# Altium PCB MOTHERBOARD.PcbDoc (part 2 of 2)
Units mm, origin at the board's own origin, x right, y up, seen from the top; angles counter-clockwise.
Board outline 100.2 x 110.2 mm, 2 copper layers (Top Layer, Bottom Layer); 252 components, 137 nets, 662 pads, 40 vias.
Unrouted connection lines stored in the file: 342.
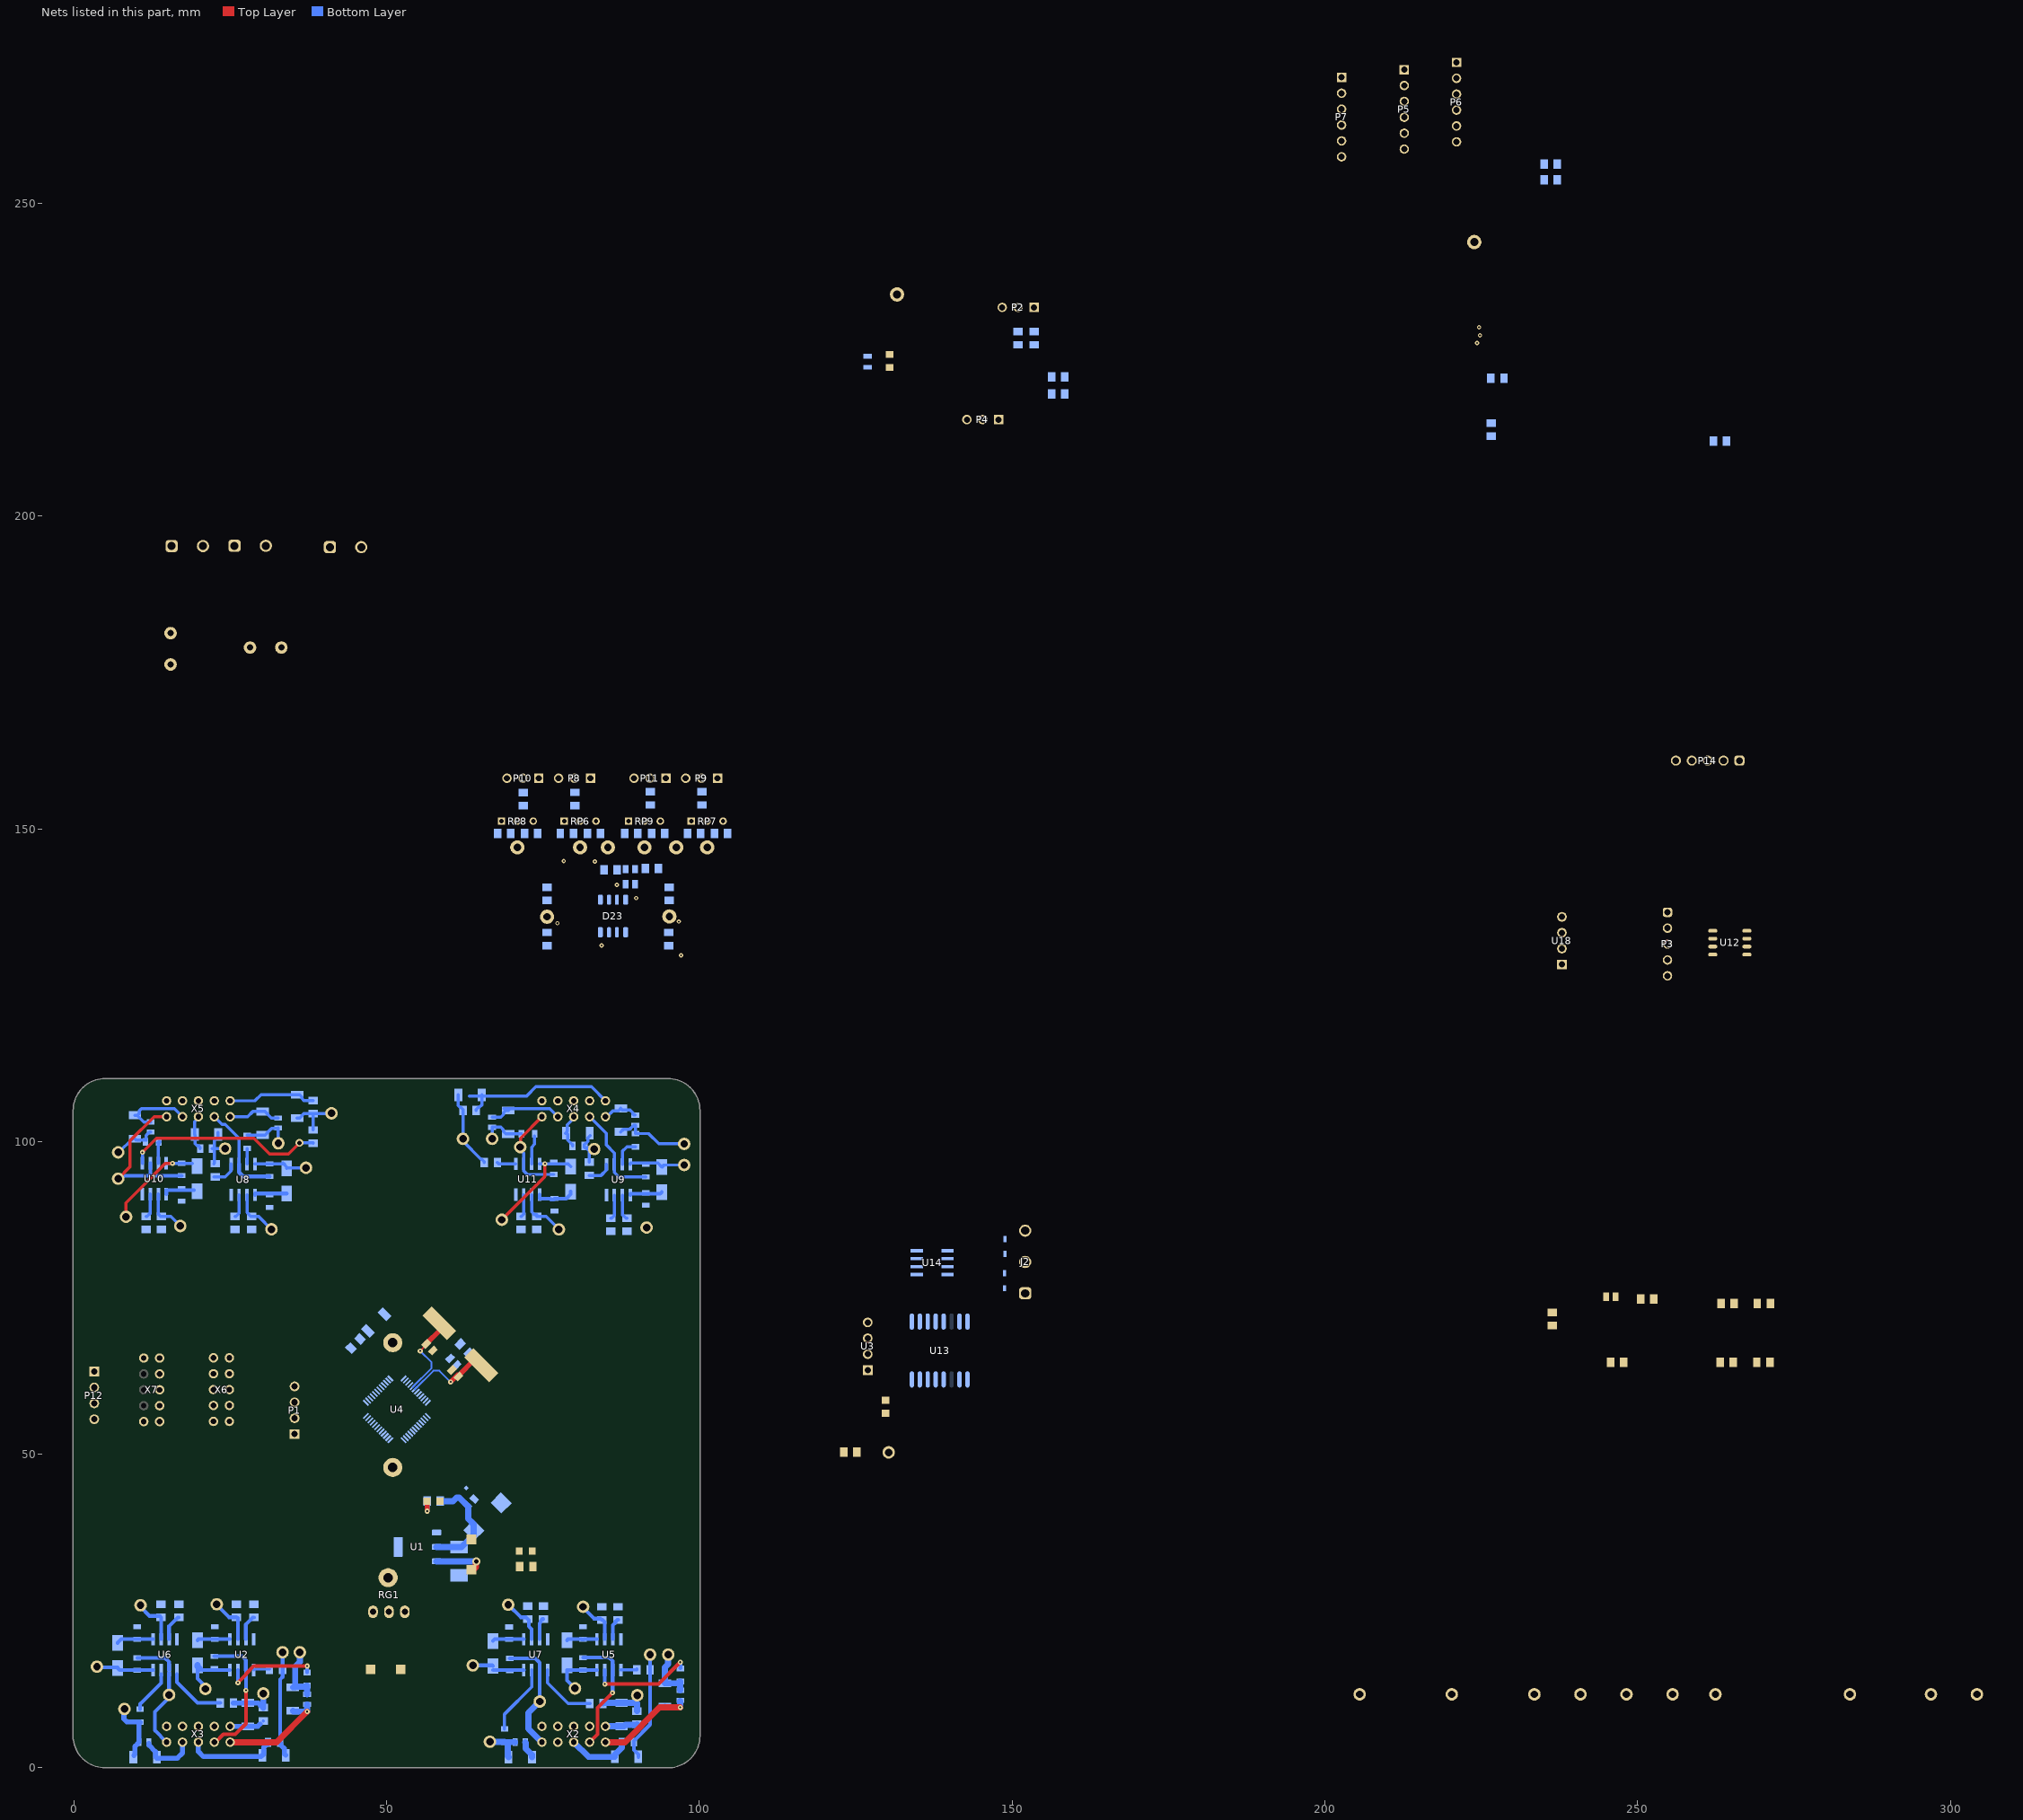
[diagram p2: the nets of this part, all layers, seen from the top]

## Part data
C1: library part CMP-04424-000193-1, "47uF 16V  ±20% 500mΩ 2312  SMD Tantalum Capacitor", Capacitance=47uF, Case Code (Imperial)=2312, Case Code (Metric)=6032, Case/Package=6032-28, ESR (Equivalent Series Resistance)=500mR, Leakage Current=7.5uA, Max Operating Temperature=125°C, Min Operating Temperature=-55°C, Package Quantity=1, Tolerance=20%, Voltage Rating=16V, Construction=Flat, Depth=3.2mm, Dissipation Factor=6%, Features="General Purpose", Height=2.8mm, Height - Seated (Max)=0.11inch, Lead Free="Lead Free", Length=6mm, Mount="Surface Mount", Number of Pins=2, Packaging="Tape and Reel", Polarity=Polar, Radiation Hardening=No, REACH SVHC="No SVHC", RoHS Compliant=Yes, Series=TAJ, Termination=SMD/SMT, Voltage Rating (DC)=16V, Width=3.2mm
C2 C45: library part 1000uF_10V_Size_F
C6: "Capacitor Polarised", Manufacturer_Name=Vishay, Mouser Part Number=74-293D106X9050E2TE3, Arrow Part Number=293D106X9050E2TE3, Arrow Price/Stock=https://www.arrow.com/en/products/293d106x9050e2te3/vishay, Datasheet Link=http://www.vishay.com/doc?40002, Height=4.3mm, Manufacturer_Part_Number=293D106X9050E2TE3, Mouser Price/Stock=https://www.mouser.com/Search/Refine.aspx?Keyword=74-293D106X9050E2TE3
C7 C9: library part CAP-POLAR
C8 C10 C17 C26 C27: library part CMP-1036-04552-2, "CAP CER 0.22UF 50V X7R 0805", Capacitance="0.22 μF", Manufacturer=KEMET, Package=C0805C-DN, Temperature="-55°C to +125°C", Temperature Characteristic=X7R, Temperature Coefficient=30ppm/°C, Temperature Range High=+125°C, Temperature Range Low=-55°C, Tolerance=0.1, Voltage Rating="50 V", Automotive=No, Category=Cap, ComponentLink2Description=Datasheet, ComponentLink2URL=https://content.kemet.com/datasheets/KEM_C1003_C0G_SMD.pdf, Device Class L1="Passive Components", Device Class L2=Capacitors, Device Class L3="Ceramic Capacitors", Digikey Description="CAP CER 0.22UF 50V X7R 0805", Height=0.88mm, Ipc Land Pattern Name=CAPC200125X78, Lead Free=Yes, Manufacturer Part Number=C0805C224K5RACTU, Material=Ceramic, Mouser Description="CAP CER 0.22UF 50V X7R 0805", Octopart=https://octopart.com/c0805c224k5ractu-kemet-144670, RoHS=TRUE
C42 C48: library part CMP-1036-04552-2, "CAP CER 16pF 50V X7R 0805", Capacitance="0.22 μF", Manufacturer=KEMET, Manufacturer Part Number=C0805C224K5RACTU, Package=C0805C-DN, Temperature="-55°C to +125°C", Temperature Characteristic=X7R, Temperature Coefficient=30ppm/°C, Temperature Range High=+125°C, Temperature Range Low=-55°C, Tolerance=0.1, Voltage Rating="50 V", Automotive=No, Category=Cap, ComponentLink2Description=Datasheet, ComponentLink2URL=https://content.kemet.com/datasheets/KEM_C1003_C0G_SMD.pdf, Device Class L1="Passive Components", Device Class L2=Capacitors, Device Class L3="Ceramic Capacitors", Digikey Description="CAP CER 0.22UF 50V X7R 0805", Height=0.88mm, Ipc Land Pattern Name=CAPC200125X78, Lead Free=Yes, Material=Ceramic, Mouser Description="CAP CER 0.22UF 50V X7R 0805", Octopart=https://octopart.com/c0805c224k5ractu-kemet-144670, RoHS=TRUE
D1 D2 D7 D8 D13 D14 D19 D20: library part CMP-12791-000009-1, "DIODE GEN PURP 400V 1A SMA", Capacitance=20pF, Forward Current=1A, Manufacturer="Diodes Inc.", Max Junction Temp=+150°C, Max Repetitive Reverse Voltage=400V, Max Surge Forward Current=30A, Package=SMA, Peak Reverse Current=5uA, Temperature="-65°C to +150°C", Temperature Range Low=-65°C, Automotive=No, Category=Diode, ComponentLink2Description=Datasheet, ComponentLink2URL=https://www.diodes.com/assets/Datasheets/ds16008.pdf, Device Class L1="Discrete Semiconductors", Device Class L2=Diodes, Device Class L3="Rectifier Diodes", Digikey Description="DIODE GEN PURP 400V 1A SMA", Footprint Url=https://www.diodes.com/assets/Package-Files/SMA.pdf, Height=2.4mm, Lead Free=Yes, Manufacturer Part Number=US1G-13-F, Mouser Description="Rectifiers 400V 1A", Octopart=https://octopart.com/us1g-13-f-diodes+inc.-334651, Reverse Voltage=400V, RoHS=TRUE, Standoff Height=0.05mm, Temperature Range High=+150°C
D3 D4 D5 D6 D9 D10 D11 D12 D15 D16 D17 D18 D21 D24 D25 D26 D27: library part CMP-249167-000001-1, "DIODE GEN PURP 75V 150MA SOD80", Capacitance=4pF, Forward Current=300mA, Manufacturer="Vishay Small Signal", Max Junction Temp=+175°C, Max Repetitive Reverse Voltage=100V, Max Surge Forward Current=2A, Package=6.560-5005.01-4, Peak Reverse Current=5uA, Reverse Voltage=75V, Temperature="to +175°C", Automotive=Yes, Automotive Grade="Grade 0", Category=Diode, ComponentLink2Description=Datasheet, ComponentLink2URL=http://www.vishay.com/docs/85557/ll4148.pdf, Device Class L1="Discrete Semiconductors", Device Class L2=Diodes, Device Class L3="Rectifier Diodes", Digikey Description="DIODE GEN PURP 75V 150MA SOD80", Height=1.6mm, Lead Free=Yes, Manufacturer Part Number=LL4448-GS08, Mouser Description="Diodes - General Purpose, Power, Switching 100 Volt 100mA", Octopart=https://octopart.com/ll4448-gs08-vishay+small+signal-40886, RoHS=TRUE, Temperature Range High=+175°C
D22 D28 D29 D30: "WURTH ELEKTRONIK - 151031YS06000 - LED, Yellow, Through Hole, T-1 (3mm), 30 mA, 2 V, 590 nm", Manufacturer_Name="Wurth Elektronik", Mouser Part Number=710-151031YS06000, Datasheet Link=https://katalog.we-online.de/led/datasheet/151031YS06000.pdf, Geometry.Height=5.5mm, Manufacturer_Part_Number=151031YS06000, Mouser Price/Stock=https://www.mouser.co.uk/ProductDetail/Wurth-Elektronik/151031YS06000?qs=LlUlMxKIyB3xSYYW%252BcuBiQ%3D%3D
D23: "Микросхема сдвоенный ОУ", Package=8-SOIC, ComponentDescription="Микросхема сдвоенный ОУ, LMV358AIDR, 8-SOIC", ComponentTypе="Микросхема сдвоенный ОУ"
D48: library part CMP-14400-000025-1, "DIODE ZENER 5.1V 300MW SOD323"
J1 J4 J15: "WR-TBL Series 101 Horizontal Entry Modular, THT, pitch 5mm, 2p", Manufacturer="Wurth Elektronik", Operating Temperature Max=105°C, Operating Temperature Min=-40°C, Rated Current=16A, Working Voltage=250V, Application="Pressure Clamp", Category="Terminal Blocks", ComponentLink1Description="Website Link", ComponentLink1URL=https://www.we-online.com/redexpert/article/691101710002?ad, ComponentLink2Description="Datasheet Link", ComponentLink2URL=https://www.we-online.com/redexpert/spec/691101710002?ad, Manufacturer Part Number=691101710002, Match Code=WR-TBL, Modularity=Yes, Mount="Through Hole", Number of Pins=2, Number of Rows=1, Orientation=Horizontal, Packaging=Box, Pitch=5mm
J2: "WR-TBL Series 101 Horizontal Entry Modular, THT, pitch 5mm, 3p", Manufacturer="Wurth Elektronik", Operating Temperature Max=105°C, Operating Temperature Min=-40°C, Rated Current=16A, Working Voltage=250V, Application="Pressure Clamp", Category="Terminal Blocks", ComponentLink1Description="Website Link", ComponentLink1URL=https://www.we-online.com/redexpert/article/691101710003?ad, ComponentLink2Description="Datasheet Link", ComponentLink2URL=https://www.we-online.com/redexpert/spec/691101710003?ad, Manufacturer Part Number=691101710003, Match Code=WR-TBL, Modularity=Yes, Mount="Through Hole", Number of Pins=3, Number of Rows=1, Orientation=Horizontal, Packaging=Box, Pitch=5mm
P1 P12: library part CMP-1024-00357-1, "0.025\" SQ Post Header, Through-hole, Vertical, -55 to 125 degC, 2.54 mm Pitch, 4-Pin, Male, RoHS", Manufacturer=Samtec, Temperature Range="-55 to 125 degC", ComponentLink1Description="Manufacturer URL", ComponentLink1URL=http://www.samtec.com, ComponentLink2Description=Datasheet, ComponentLink2URL=http://www.samtec.com/documents/webfiles/pdf/TSW_TH.PDF, ComponentLink3Description="Package Specification", ComponentLink3URL=http://www.samtec.com/documents/webfiles/cpdf/TSW-XXX-XX-XXX-X-XX-XXX-MKT.pdf, DatasheetVersion=F-214, Mounting Technology=Through-hole, Orientation=Vertical, PackageDescription=".025[0.64] SQ. Post Terminal Strip Assembly", PackageReference=TSW-104-08-X-S, PackageVersion="DM, 8/1988", PartNumber=TSW-104-08-G-S, Pitch="2.54 mm", RoHS=True
P2 P4 P8 P9 P10 P11: "WR-WTB THT Male Vertical Locking Header, pitch 2.54mm, 3p", Contact Resistance=20mOhm, Operating Temperature="-40 to +105degC", Rated Current=3A, Withstanding Voltage=1000VAC, Working Voltage=250VAC, ComponentLink1Description=Manufacturer, ComponentLink1URL=http://www.we-online.de, ComponentLink2Description=Datasheet, ComponentLink2URL=https://www.we-online.com/catalog/datasheet/61900311121.pdf, Gender=Male, Mounting Technology=THT, Packaging=Bag, Part Number=61900311121, Pin Number=3, Pitch=2.54mm, Published Date="January 2020", Publisher="Wurth Elektronik", Type=Vertical
P3: "WR-WTB THT Male Vertical Locking Header, pitch 2.54mm, 5pins", Contact Resistance=20mΩ, Manufacturer="Wurth Elektronik", Operating Temperature Max=105°C, Operating Temperature Min=-40°C, Rated Current=3A, Withstanding Voltage=1000VAC, Working Voltage=250VAC, Category="Wire-to-Board Connectors", ComponentLink1Description="Website Link", ComponentLink1URL=https://www.we-online.com/redexpert/article/61900511121?ad, ComponentLink2Description="Datasheet Link", ComponentLink2URL=https://www.we-online.com/redexpert/spec/61900511121?ad, Gender=Male, Height=11.5mm, Length=12.7mm, Manufacturer Part Number=61900511121, Match Code=WR-WTB, Mount="Through Hole", Number of Pins=5, Number of Rows=1, Orientation=Vertical, Packaging=Bag, Pitch=2.54mm, Width=5.8mm
P5 P6 P7: "WR-WTB THT Male Vertical Locking Header, pitch 2.54mm, 6p", Contact Resistance=20mOhm, Operating Temperature="-40 to +105degC", Rated Current=3A, Withstanding Voltage=1000VAC, Working Voltage=250VAC, ComponentLink1Description=Manufacturer, ComponentLink1URL=http://www.we-online.de, ComponentLink2Description=Datasheet, ComponentLink2URL=https://www.we-online.com/catalog/datasheet/61900611121.pdf, Gender=Male, Mounting Technology=THT, Packaging=Bag, Part Number=61900611121, Pin Number=6, Pitch=2.54mm, Published Date="January 2020", Publisher="Wurth Elektronik", Type=Vertical
P14: "WR-PHD Pin Header, THT, Vertical, pitch 2.54mm, 1 Row, 5P", Contact Resistance=20mΩ, Manufacturer="Wurth Elektronik", Operating Temperature Max=105°C, Operating Temperature Min=-40°C, Rated Current=3A, Withstanding Voltage=500V, Working Voltage=250V, Category="Board-to-Board Connectors", ComponentLink1Description="Website Link", ComponentLink1URL=https://www.we-online.com/redexpert/article/61300511121?ad, ComponentLink2Description="Datasheet Link", ComponentLink2URL=https://www.we-online.com/redexpert/spec/61300511121?ad, Gender="Pin Header", Manufacturer Part Number=61300511121, Match Code=WR-PHD, Mount="Through Hole", Number of Pins=5, Number of Rows=1, Orientation=Vertical, Packaging=Bag, Pitch=2.54mm
R1 R2 R10 R17 R18 R19 R21 R31 R32 R33 R34 R45 R46 R47 R48 R58 R59 R60 R61 R83 R84 R85 R86 R87 R88 R89 R93 R94 R97 R99 R100 R101 R102: library part CRCW08050000Z0EA
R3 R4 R5 R8 R9 R20 R22 R38 R39 R57 R62 R63 R64 R65 R66 R67 R68 R91 R92 R95 R96 R113: library part RC0805FR-07100KL
R6 R7 R11 R12 R23 R24 R25 R26 R35 R36 R37 R40 R49 R50 R51 R52: library part CMP-03412-028725-1, "RES SMD 10 OHM 1% 1/8W 0805", Manufacturer=Yageo, Package=RT0805, Power Rating=0.125W, Resistance=10Ω, Temperature="-55°C to +155°C", Temperature Coefficient="50 ppm/°C", Temperature Range High=+155°C, Temperature Range Low=-55°C, Tolerance=0.0001, Voltage Rating=150V, Automotive=No, Category=Res, ComponentLink2Description=Datasheet, ComponentLink2URL=http://www.yageo.com/documents/recent/PYu-RT_1-to-0.01_RoHS_L_9.pdf, Composition="Thin Film", Device Class L1="Passive Components", Device Class L2=Resistors, Device Class L3="Chip SMD Resistors", Digikey Description="RES SMD 10 OHM 1% 1/8W 0805", Footprint Url=http://www.yageo.com/exep/pages/download/literatures/PYu-R_Mount_10.pdf, Height=0.6mm, Ipc Land Pattern Name=RESC200125X50, Lead Free=Yes, Manufacturer Part Number=RT0805FRE0710RL, Mouser Description="High Precision-High Stability Chip Resistor Thin Film 0805 10Ohm 1% Paper T/R", Octopart=https://octopart.com/rt0805fre0710rl-yageo-39855890, RoHS=TRUE, Series=RT
R13 R14 R15 R16 R27 R28 R29 R30 R41 R42 R43 R44 R53 R54 R55 R56 R98: library part CMP-2001-04908-2, "RES Thick Film, 10kΩ, 1%, 0.125W, 100ppm/°C, 0805", Case Code (Imperial)=0805, Case Code (Metric)=2012, Max Operating Temperature=155°C, Min Operating Temperature=-55°C, Package Quantity=5000, Power Rating=125mW, Resistance=10kR, Temperature Coefficient=100ppm/°C, Tolerance=1%, Voltage Rating=150V, Case/Package=0805, Composition="Thick Film", Contact Plating=Tin, Depth=1.25mm, Height=0.45mm, Lead Free="Lead Free", Length=2mm, Military Standard=Not, Packaging="Tape and Reel", Radiation Hardening=No, Termination=SMD/SMT, Voltage Rating (DC)=150V, Weight=0.000194oz, Width=1.25mm
RG1: "REG IC REG LINEAR 5V 1A TO220AB", Current-Output=1A, Digikey Part Number=LM7805CT-ND, Manufacturer=Fairchild, Mouser Part Number=512-LM7805CT, Package=TO220, Part Number=LM7805CT, Temperature="-40°C to +125°C", Temperature Range High=+125°C, Temperature Range Low=-40°C, Voltage - Input (Max)=35V, Voltage - Output=5V, Voltage Dropout (Max)="2V @ 1A (Typ)", ComponentLink1Description=Upverter, ComponentLink1URL=https://upverter.com/upn/revision/b27a7358b7dd93a3/, ComponentLink2Description=Datasheet, ComponentLink2URL=https://www.fairchildsemi.com/datasheets/LM/LM7805.pdf, Digikey Description="REG IC REG LINEAR 5V 1A TO220AB", helpURL=https://upverter.com/upn/revision/b27a7358b7dd93a3/, Ipc Land Pattern Name=TO-220, Lead Free=yes, Price=0.384521982769, RoHS=TRUE, Supplier 1=Digi-Key, Supplier 2=Mouser, Supplier Part Number 1=LM7805CT-ND, Supplier Part Number 2=512-LM7805CT
RP6 RP7 RP8 RP9: library part 3296W-1-202LF
TP1 TP2 TP3 TP4 TP5 TP6 TP7 TP8 TP9 TP10 TP11 TP12 TP13 TP14 TP15 TP16 TP17 TP18 TP19 TP20 TP21 TP22 TP23 TP24 TP25 TP26 TP27 TP28 TP29 TP30 TP31 TP32 TP33 TP34 TP35 TP36 TP37 TP38 TP39 TP40 TP41 TP42 TP43 TP44 TP45 TP46 TP47 TP48 TP49 TP50 TP51 TP52 TP53 TP54 TP55 TP56 TP57: library part TP_PCB?, "Test_Point"
U1: library part CMP-0062-01639-4, "800mA Low-Dropout Linear Regulator, 4-pin SOT-223, Pb-Free", Manufacturer="Texas Instruments", PackageTopMarking=XYTT*N05A, PowerWise=N, Code_IPC=SOT223-4, Code_JEDEC=TO-261-AA, ComponentLink1Description="Datasheet URL", ComponentLink1URL=http://www.ti.com/general/docs/lit/getliterature.tsp?genericPartNumber=LM1117-N&fileType=pdf, CompType="LDO IC", High-Reliability=Y, PackageDescription="Molded SOT-223, 6.50 x 3.56 x 1.6mm Body, 4 Lead, 2.3mm Pitch", PackageReference=DCY0004A, PartNumber=LM1117MPX-3.3/NOPB, PinCount=4, RoHS=Y
U2 U5 U6 U7 U8 U9 U10 U11: "No Description Available", Mfr_Name=Infineon, Copyright="Copyright (C) 2023 Ultra Librarian. All rights reserved.", Manufacturer_Part_Number=IR2104SPBF, RefDes=RefDes, Type=DEV
U3 U18: library part B0505s-1W, "DC DC Converter 5V 1W"
U4: "No Description Available", Mfr_Name=STMicroelectronics, RefDes=RefDes, Type=Type
U12: library part CMP-0534-00654-1, "Hot Swappable, Dual I2C Isolator, 3 to 5.5 V, -40 to 105 degC, 8-Pin SOIC (R-8), RoHS, Tube", Generic Part Number=ADUM1250, Supply Voltage Max="5.5 V", Supply Voltage Min="3 V", Temperature Max="105 degC", Temperature Min="-40 degC", Code_JEDEC=MS-012-AA, ComponentLink1Description="Manufacturer URL", ComponentLink1URL=http://www.analog.com/, ComponentLink2Description=Datasheet, ComponentLink2URL=http://www.analog.com/media/en/technical-documentation/data-sheets/ADUM1250_1251.pdf, Data Rate="1 Mbps", DatasheetVersion="Rev. H", Mounting Technology="Surface Mount", PackageDescription="8-Pin Small Outline Package, Body 4.9 x 3.9 mm, Pitch 1.27 mm", Packing=Tube, PartNumber=ADuM1250ARZ, RoHS=TRUE
U13: library part CMP-0534-00565-1, "Quad Channel Digital Isolator, 2.5 KV rms Insulation Rating, 10 Mbps Data Rate, 50 ns Delay, Industrial, 16-pin SOIC (RW-16), Tube", Manufacturer="Analog Devices", Max Operating Temp (degreesC)=125, Code_JEDEC=MS-013-AA, ComponentLink1Description="Manufacturer URL", ComponentLink1URL=http://www.analog.com/en/index.html, ComponentLink2Description=Datasheet, ComponentLink2URL=http://www.analog.com/static/imported-files/data_sheets/ADuM1400_1401_1402.pdf, ComponentLink3Description="Package Specification", ComponentLink3URL=http://www.analog.com/static/imported-files/packages/PKG_PDF/SOIC_WIDE%20%28RW%29/RW_16.pdf, ComponentLink4Description="URL Link1", ComponentLink4URL="Product URL:http://www.analog.com/en/interface-isolation/digital-isolators/adum1401/products/product.html", ComponentLink5Description="URL Link2", ComponentLink5URL="Reference Circuit:http://www.analog.com/en/interface-isolation/digital-isolators/adum1401/products/product.html#product-recommendations", DatasheetVersion="Rev. H", Max Data Rate=10Mbps, Mounting Technology="Surface Mount", PackageDescription="16-Pin Standard Small Outline Package, Body 10.3 x 7.5 mm, Pitch 1.27 mm", PackageReference=RW-16, PackageVersion="032707-B, 03/2007", PartNumber=ADUM1401BRWZ
U14: library part CMP-05679-000003-1, "IC TXRX RS485/RS422 8-SOIC", Manufacturer="Maxim Integrated", Max Supply Voltage=5.25V, Min Supply Voltage=4.75V, Nominal Supply Current=300-500uA, Package=S8-5, Temperature="0°C to +70°C", Temperature Range High=+70°C, Temperature Range Low=0°C, Automotive=No, Category=IC, ComponentLink2Description=Datasheet, ComponentLink2URL=https://datasheets.maximintegrated.com/en/ds/MAX1487E-MAX491E.pdf, Data Rate=2.5Mbits/s, Device Class L1="Integrated Circuits (ICs)", Device Class L2="Interface ICs", Device Class L3="RS-232 / RS-422 / RS-485 Interface ICs", Digikey Description="IC TXRX RS485/RS422 8-SOIC", Footprint Url=https://pdfserv.maximintegrated.com/land_patterns/90-0096.PDF, Height=1.75mm, Interface=RS-485,RS-422, Lead Free=Yes, Manufacturer Part Number=MAX485ECSA+, Mouser Description="MAX485E Series 2.5 Mbps 12 V Half-Duplex SMT RS 485 Transceiver - SOIC-8", Number Of Receivers=1, Number Of Transmitters=1, Octopart=https://octopart.com/max485ecsa%2B-maxim+integrated-39397871, RoHS=TRUE, Simplex Duplex="Half Duplex", Standoff Height=0.1mm
X1: library part CMP-2000-05726-1, "Low Profile Crystal, 16.0 MHz, +/- 30 ppm, -20 to 70 degC, 2-Pin SMD, RoHS, Tape and Reel", Case Height=4.2mm, Case Length=11.4mm, Case Width=4.7mm, Frequency=8MHz, Frequency Stability=50PPM, Load Capacitance=18pF, Manufacturer=ABRACON, Operating Temperature Range=-20Cto+70C, Package / Case=HC-49/US, Package Description="2-Pin Surface Mount Device, Body 11.4 x 4.7 mm", Package Reference=ABLS-14.7456MHZ-B2-T, Tolerance=30PPM, Brand=ABRACON, Datasheet URL=http://www.abracon.com/Resonators/abls.pdf, Datasheet Version=04/2011, Dimensions=4.7mmWx11.4mmLx4.2mmH, ESR=80Ohms, Factory Pack Quantity=1000, Manufacturer URL=http://www.abracon.com/, Mounting Style=SMD/SMT, Mounting Technology=SurfaceMount, Package URL=http://www.abracon.com/Support/PackageDrawing/Resonators/ABLS-2D.pdf, Packaging=Reel, Product Category=Crystals, RoHS=Details, Series=ABLS, Termination Style=SMD/SMT, Type=LowProfileMicroprocessorCrystal
Z1 Z2: "Zener Diode", Manufacturer_Name=onsemi, Mouser Part Number=863-MM3Z5V1ST1G, Arrow Part Number=MM3Z5V1ST1G, Arrow Price/Stock=https://www.arrow.com/en/products/mm3z5v1st1g/on-semiconductor?region=nac, Datasheet Link=http://www.onsemi.com/pub/Collateral/MM3Z2V4ST1-D.PDF, Height=1.1mm, Manufacturer_Part_Number=MM3Z5V1ST1G, Mouser Price/Stock=https://www.mouser.co.uk/ProductDetail/onsemi/MM3Z5V1ST1G?qs=HVbQlW5zcXXFXX%2FQxsNWFg%3D%3D

## Via types
v1: diameter 0.8, hole 0.3, Top Layer to Bottom Layer, 22 vias
v2: diameter 0.7/0.7 (per signal layer), hole 0.3, Top Layer to Bottom Layer, tented both sides, 12 vias
v3: diameter 5, hole 3, Top Layer to Bottom Layer, 4 vias
v4: diameter 1.27, hole 0.711, Top Layer to Bottom Layer, 2 vias

## Nets (pads, with @x,y where several pads share a name; then routed paths per layer and width w, separated by ;. In a path a pad name is that pad's centre, name@x,y a point inside that pad or via, vN(x,y) a via of type N, cw(c..) or ccw(c..) an arc to the next point about the centre after c; other vN are vias at no path point)
+3V3: C1.2 C6.1 C8.1 C10.1 C45.1 D27.2 D48.1 P1.1 P5.1 P6.1 P7.1 P14.4 R1.2 R3.2 R4.2 R10.2 R57.2 R89.2 TP48.1 U1.2 U1.4 U4.9 U4.24 U4.36 U4.48 U12.1 X2.9 X3.9 X4.9 X5.9 X6.2 X7.2 | length 16.7
  Bottom Layer w1: U1.2@58,35.225 C1.2@61.306,35.225 ; R57.2@58.602,42.525 60.605,42.525 D48.1@61.175,43.095 61.635,43.095 62.911,41.818 C8.1@62.947,41.818 63.053,41.712 63.053,39.725 63.952,38.825 63.952,37.127 62,35.175 C1.2@61.6,35.175
  other v2: 224.657,230.179
+5V: C2.1 C26.1 C27.1 D23.8 J4.1 P2.3 P4.3 P5.2 P6.2 P8.3 P9.3 P10.3 P11.3 P12.4 P14.5 R68.2 R87.2 R88.2 R99.2 R100.2 RG1.3 RP6.1 RP7.1 RP8.1 RP9.1 TP13.1 TP14.1 U1.3 U3.2 U13.1 U13.7 U18.2 X6.1 X7.1 | length 8.2
  Top Layer w1: C2.1@63.571,31.587 63.892,31.587 64.281,31.977 64.281,32.873 v4(64.333,32.925)
  Bottom Layer w1: U1.3@58,32.925 v4(64.333,32.925)
+5V_ISO: C17.1 R5.2 R8.2 R9.2 TP47.1 U3.4 U13.10 U13.16 U14.8
GND: BT1.1 C1.1 C2.2 C3.1 C4.1 C6.2 C7.2 C8.2 C9.2 C10.2 C14.1 C15.1 C16.1 C20.1 C25.1 C26.2 C27.2 C29.1 C42.2 C45.2 C48.2 D22.2 D23.4 D28.2 D29.2 D30.2 D48.2 J1.1 J4.2 J15.1 P1.4 P2.1 P4.1 P5.6 P6.6 P7.6 P8.1 P9.1 P10.1 P11.1 P12.3 P14.1 R2.2 R13.1 R14.1 R15.1 R16.1 R22.2 R27.1 R28.1 R29.1 R30.1 R39.2 R41.1 R42.1 R43.1 R44.1 R53.1 R54.1 R55.1 R56.1 R67.1 R93.1 R94.1 R95.1 R96.1 R101.2 R102.2 RG1.2 RP6.3 RP7.3 RP8.3 RP9.3 U1.1 U2.4 U3.1 U4.8 U4.23 U4.35 U4.47 U5.4 U6.4 U7.4 U8.4 U9.4 U10.4 U11.4 U12.4 U13.2 U13.8 U18.1 X2.8 X2.10 X3.8 X3.10 X4.8 X4.10 X5.8 X5.10 X6.3 X7.3
  other v2: 77.308,134.931 96.735,135.206 89.927,138.942 224.807,228.904
GND_2: C17.2 J2.2 R65.1 R66.1 TP57.1 U3.3 U13.9 U13.15 U14.5 Z1.2 Z2.2
NetBT1_2: BT1.2 D27.1 U4.1
NetC5_1: C5.1 U2.6 X3.2 | length 21.7
  Top Layer w0.6: X3.2@22.46,4 22.649,4 23.915,5.265 25.83,5.265 27.526,6.961 v1(27.526,12.275)
  Bottom Layer w0.6: C5.1@22.475,17.75 26.868,17.75 27.51,17.108 U2.6@27.51,15.536 27.518,15.528 27.518,12.283 v1(27.526,12.275)
NetC5_2: C5.2 D1.1 TP1.1 U2.8 | length 10
  Bottom Layer w0.6: D1.1@19.775,15.751 19.775,14.174 21.045,12.904 TP1.1@21.045,12.525 ; D1.1@19.775,16.305 20.543,15.536 22.55,15.536 U2.8@24.97,15.536
  Bottom Layer w0.98: D1.1@19.775,16.305 19.775,16.111 D1.1@20.135,15.751
NetC11_1: C11.1 U5.6 X2.2 | length 19.5
  Top Layer w0.6: X2.2@82.46,4 83.725,5.265 83.725,9.5 v1(86.125,11.9)
  Bottom Layer w0.6: C11.1@81.421,17.536 85.566,17.536 86.15,16.952 86.15,15.557 U5.6@86.171,15.536 86.15,15.515 86.15,11.925 v1(86.125,11.9)
NetC11_2: C11.2 D2.1 TP2.1 U5.8 | length 8.2
  Bottom Layer w0.6: TP2.1@80.122,12.6 78.852,13.87 78.852,15.536 U5.8@83.631,15.536
NetC12_1: C12.1 TP25.1 U6.6 X3.5 | length 19.4
  Bottom Layer w0.6: C12.1@10.15,17.475 14.575,17.475 15.235,16.815 U6.6@15.235,15.536 ; X3.5@14.84,4 12.95,5.89 12.95,8.85 15.235,11.135 TP25.1@15.235,11.562 U6.6@15.235,15.025
NetC12_2: C12.2 D7.1 TP9.1 U6.8 | length 9.2
  Bottom Layer w0.6: TP9.1@3.643,15.95 D7.1@7.025,15.95 ; D7.1@7.025,15.85 7.339,15.536 U6.8@12.695,15.536
NetC13_1: C13.1 TP26.1 U7.6 X2.5 | length 19.4
  Bottom Layer w0.6: C13.1@69.7,17.4 73.795,17.4 74.474,16.721 U7.6@74.474,15.536 ; TP26.1@74.487,10.513 U7.6@74.487,15.523
  Bottom Layer w0.98: TP26.1@74.487,10.513 TP26.1@74.5,10.5 72.681,8.681 72.681,6.159 X2.5@74.84,4
NetC13_2: C13.2 D8.1 TP10.1 U7.8 | length 8.1
  Bottom Layer w0.6: TP10.1@63.8,16.275 66.9,16.275 D8.1@67,16.175 ; D8.1@67.041,15.536 U7.8@71.934,15.536
NetC21_1: C21.1 U8.6 X5.2 | length 16
  Bottom Layer w0.5: X5.2@22.46,104 23.71,102.75 24.2,102.75 26.425,100.525 U8.6@26.425,96.451
  Bottom Layer w0.6: U8.6@26.425,96.425 26.425,95.094 27.079,94.44 C21.1@31.3,94.44
NetC21_2: C21.2 D13.1 TP29.1 U8.8 | length 9
  Bottom Layer w0.5: U8.8@28.965,96.425 D13.1@33.575,96.425 ; D13.1@33.425,96.575 D13.1@33.575,96.425 ; D13.1@33.7,96.425 D13.1@33.575,96.425 ; TP29.1@37.125,95.825 34.125,95.825 D13.1@34.025,95.725 34.025,95.975 D13.1@33.575,96.425
NetC22_1: C22.1 U9.6 X4.2 | length 15.9
  Bottom Layer w0.5: X4.2@82.46,104 83.71,102.75 83.721,102.75 83.981,102.491 83.981,102.479 85.116,101.344 85.116,99.501 86.415,98.202 U9.6@86.415,96.389 86.424,96.379 86.424,95.073 87.094,94.404 C22.1@91.456,94.404
NetC22_2: C22.2 D14.1 TP30.1 U9.8 | length 9.2
  Bottom Layer w0.5: U9.8@88.955,96.389 88.955,96.546 88.984,96.575 93.4,96.575 94,95.975 D14.1@94,95.925 94.351,96.276 TP30.1@97.587,96.276
NetC23_1: C23.1 TP43.1 U10.6 X5.5 | length 26.6
  Top Layer w0.5: TP43.1@7.095,94.086 8.95,95.941 8.95,100.102 12.848,104 X5.5@14.84,104
  Bottom Layer w0.6: TP43.1@7.095,94.086 7.501,94.086 7.98,94.565 12.245,94.565 ; U10.6@12.245,96.55 12.245,94.565 ; C23.1@17.243,94.565 12.245,94.565
NetC23_2: C23.2 D19.1 TP37.1 U10.8 | length 16.4
  Top Layer w0.5: TP37.1@8.355,88 8.355,90.237 14.623,96.505 15.728,96.505 v1(15.773,96.55)
  Bottom Layer w0.5: U10.8@14.785,96.55 v1(15.773,96.55) 17.243,96.55 D19.1@18.946,96.55
NetC24_1: C24.1 TP44.1 U11.6 X4.5 | length 15.4
  Top Layer w0.5: TP44.1@71.375,99.138 71.414,99.177 71.414,100.574 X4.5@74.84,104
  Bottom Layer w0.5: TP44.1@71.375,99.138 71.375,98.732 71.908,98.199 71.908,96.485 71.959,96.435 71.959,95.294 72.482,94.771 C24.1@76.738,94.771
NetC24_2: C24.2 D20.1 TP38.1 U11.8 | length 17
  Top Layer w0.5: TP38.1@68.429,87.525 75.321,94.417 v1(75.321,96.485)
  Bottom Layer w0.5: U11.8@74.47,96.464 74.492,96.485 78.985,96.485 D20.1@79.45,96.021
NetC42_1: C42.1 U4.5 X1.1 | length 14.3
  Top Layer w0.3: v1(55.379,66.535) 56.078,67.234 56.078,67.914 C42.1@56.22,68.055 ; X1.1@57.932,71.298 58.515,70.716 X1.1@58.515,69.86
  Top Layer w0.8: C42.1@56.42,67.765 X1.1@58.515,69.86
  Bottom Layer w0.3: U4.5@54.141,60.743 57.2,63.802 57.2,64.714 v1(55.379,66.535)
NetC48_1: C48.1 U4.6 X1.2 | length 13.8
  Top Layer w0.3: X1.2@63.635,64.739 64.908,64.739 X1.2@65.262,64.386
  Top Layer w0.8: v1(60.241,61.593) 61.355,62.706 C48.1@61.602,62.706 ; C48.1@61.885,62.989 X1.2@63.635,64.739
  Bottom Layer w0.3: U4.6@54.494,60.39 57.483,63.378 58.455,63.378 v1(60.241,61.593)
NetD3_1: D3.1 R6.1 R11.2 TP3.1 | length 10
  Bottom Layer w0.98: TP3.1@36.129,18.375 36.129,16.821 35.404,16.096 35.404,12.915 35.269,12.78 D3.1@35.029,12.78 35.404,12.78 35.482,12.858 37.037,12.858 37.194,13.015 37.264,13.015 R11.2@37.304,13.055 R6.1@37.304,11.657
NetD3_2: D3.2 R6.2 X3.1 | length 17.8
  Top Layer w0.98: X3.1@25,4 32.409,4 v1(37.304,8.895)
  Bottom Layer w0.98: D3.2@35.029,9.03 35.164,8.895 v1(37.304,8.895) R6.2@37.304,10.053
NetD4_1: D4.1 R7.1 R12.2 TP4.1 | length 8.8
  Bottom Layer w0.98: TP4.1@95.032,18 95.015,17.983 95.015,16.484 94.488,15.958 D4.1@94.488,13.425 96.618,13.425 96.853,13.66 96.923,13.66 R12.2@96.963,13.7 R7.1@96.963,12.302
NetD4_2: D4.2 D5.2 R7.2 R19.1 X2.1 X3.3 | length 32.4
  Top Layer w1: X2.1@85,4 88.088,4 93.638,9.55 v1(96.963,9.55)
  Bottom Layer w0.8: X3.3@19.92,4 19.92,2.505 20.725,1.7 29.925,1.7 D5.2@30.15,1.925 30.375,2.15 30.375,3.175 30.873,3.673 30.971,3.673 30.977,3.679 R19.1@30.977,3.977
  Bottom Layer w1: D4.2@94.488,9.675 94.613,9.55 v1(96.963,9.55) R7.2@96.963,10.602
NetD5_1: D5.1 R17.1 R19.2 TP7.1 | length 17
  Bottom Layer w0.6: R19.2@32.976,3.977 32.976,14.03 33.376,14.43 R17.1@33.376,15.675 TP7.1@33.376,18.375
  Bottom Layer w0.8: R19.2@32.878,3.977 33.079,3.777 33.079,3.576 33.675,2.98 33.675,2.15 D5.1@33.9,1.925
NetD6_1: D6.1 R18.1 R21.2 TP8.1 | length 17.7
  Bottom Layer w0.6: D6.1@90.25,1.65 90.25,2.025 90.115,2.16 90.113,2.16 89.539,2.734 89.539,3.888 89.526,3.901 89.526,4.201 92.132,6.807 R18.1@92.132,15.536 TP8.1@92.132,18
NetD6_2: D6.2 R21.1 X2.3 | length 10.4
  Bottom Layer w0.98: X2.3@79.92,4 82.27,1.65 D6.2@86.5,1.65 86.5,2.025 87.611,3.136 87.611,3.987 R21.1@87.624,4
NetD9_1: D9.1 R23.1 R25.2 TP11.1 | length 9.2
  Bottom Layer w0.8: TP11.1@8.1,9.316 8.014,9.23 8.014,7.719 8.482,7.25 10.55,7.25 R25.2@10.6,7.2 ; D9.1@9.602,1.9 9.752,2.05 9.752,3.3 R23.1@10.221,3.769 ; R23.1@10.398,4 10.398,6.681
NetD9_2: D9.2 R23.2 X3.4 | length 9
  Bottom Layer w0.8: R23.2@12.006,3.769 12.006,3.529 13.052,2.483 13.052,1.675 13.277,1.45 16.55,1.45 17.38,2.28 X3.4@17.38,4
NetD10_1: D10.1 R24.1 R26.2 TP12.1 | length 6.1
  Bottom Layer w0.98: TP12.1@66.525,4.075 66.55,4.05 68.85,4.05 R26.2@68.875,4.025 68.888,4.012 70.561,4.012 R24.1@70.573,4 ; R26.2@69.365,3.605 69.365,1.76 D10.1@69.5,1.625
NetD10_2: D10.2 R24.2 X2.4 | length 2.8
  Bottom Layer w0.98: R24.2@72.177,4 72.263,3.914 72.263,2.987 73.25,2 D10.2@73.25,1.625
NetD11_1: D11.1 R31.1 R33.2 TP27.1 | length 6.8
  Bottom Layer w0.8: R31.1@25.521,10.286 D11.1@27.825,10.286 29.503,10.286 29.796,9.993 R33.2@29.796,9.865
  Bottom Layer w1: R33.2@30.3,9.512 TP27.1@30.3,11.78
NetD11_2: D11.2 R33.1 X3.6 | length 5
  Bottom Layer w0.5: R33.1@30.3,7.41 R33.1@30.31,7.42
  Bottom Layer w0.8: X3.6@25.01,6.55 X3.6@25,6.54 25.002,6.538 27.823,6.538 D11.2@27.825,6.536 29.426,6.536 R33.1@29.796,6.906
NetD12_1: D12.1 R32.1 R34.2 TP28.1 | length 6.8
  Bottom Layer w0.98: R32.1@84.626,10.175 84.626,10.187 84.739,10.3 D12.1@87.575,10.3 89.99,10.3 90.055,10.235 90.055,9.002 R34.2@90.029,8.976
NetD12_2: D12.2 R34.1 X2.6 | length 5.2
  Bottom Layer w0.98: X2.6@85,6.54 85.005,6.545 87.57,6.545 D12.2@87.575,6.55 87.95,6.55 88.161,6.761 89.916,6.761 R34.1@90.029,6.874
NetD15_1: D15.1 R35.1 R37.2 TP31.1 | length 7.9
  Bottom Layer w0.5: R37.2@27.695,101.025 27.72,101.05 30.175,101.05 D15.1@30.2,101.075 30.575,101.075 30.95,101.45 31.634,102.134 32.603,102.134 R35.1@32.667,102.198 32.683,102.181 32.683,99.767 TP31.1@32.7,99.75
NetD15_2: D15.2 R35.2 X5.1 | length 8.4
  Bottom Layer w0.5: X5.1@25,104 27.789,104 28.614,104.825 30.575,104.825 31.598,103.802 R35.2@32.667,103.802
NetD16_1: D16.1 R36.1 R40.2 TP32.1 | length 12.8
  Bottom Layer w0.5: D16.1@87.45,101.575 87.825,101.95 88.824,101.95 89.368,102.494 89.522,102.648 R36.1@89.749,102.648 89.777,102.62 89.777,101.328 R40.2@89.806,101.3 91.9,101.3 93.525,99.675 TP32.1@97.85,99.675
NetD16_2: D16.2 R36.2 X4.1 | length 5.9
  Bottom Layer w0.5: X4.1@85,104 85.221,104 86.171,104.95 87.075,104.95 D16.2@87.45,105.325 87.68,105.095 88.906,105.095 89.368,104.633 89.368,104.406 89.522,104.252 R36.2@89.749,104.252
NetD17_1: D17.1 R45.1 R47.2 TP35.1 | length 7.4
  Bottom Layer w0.5: R47.2@22.101,98.902 R47.2@22.502,98.902 ; R45.1@22.405,96.491 22.502,96.588 R47.2@22.502,98.902 ; D17.1@23.073,101.475 23.073,100.752 22.502,100.181 R47.2@22.502,98.902 ; TP35.1@24.2,98.902 R47.2@22.502,98.902
NetD17_2: D17.2 R47.1 X5.3 | length 5.8
  Bottom Layer w0.5: X5.3@19.92,104 19.92,103.827 19.3,103.207 19.3,101.152 19.407,101.045 19.407,99.695 19.746,99.356 19.946,99.356 20.2,99.103 R47.1@20.2,98.902
NetD18_1: D18.1 R46.1 R48.2 TP36.1 | length 6.4
  Bottom Layer w0.5: R48.2@81.874,98.867 82.075,98.867 82.385,98.557 R46.1@82.385,96.726 ; D18.1@82.545,100.971 82.17,100.596 82.17,100.068 81.877,99.775 81.874,99.775 81.621,99.522 R48.2@81.621,99.321 81.621,99.12 81.67,99.071 81.874,99.071 82.075,99.071 82.947,99.071 TP36.1@83.197,98.821
NetD18_2: D18.2 R48.1 X4.3 | length 5.6
  Bottom Layer w0.5: D18.2@78.575,101.344 78.898,101.666 78.898,102.707 79.92,103.729 X4.3@79.92,104 ; D18.2@78.795,101.346 78.95,101.191 78.95,100.288 79.463,99.775 79.466,99.775 79.719,99.522 R48.1@79.719,99.321
NetD21_1: D21.1 R49.1 R51.2 TP39.1 | length 7.2
  Bottom Layer w0.5: TP39.1@7.1,98.3 7.211,98.3 9.395,100.484 D21.1@9.77,100.484 10.028,100.226 11.53,100.226 11.541,100.238 11.541,101.012 11.899,101.37 11.899,101.401 12.053,101.555 R49.1@12.28,101.555
NetD21_2: D21.2 R49.2 X5.4 | length 11.4
  Bottom Layer w0.5: D21.2@9.77,104.234 D21.2@10.145,104.234 ; R49.2@12.28,103.159 11.22,103.159 D21.2@10.145,104.234 ; X5.4@17.38,104 16.11,105.27 10.813,105.27 10.52,104.977 10.52,104.609 D21.2@10.145,104.234
NetD22_1: D22.1 R57.1 | length 3.2
  Top Layer w0.8: D22.1@56.45,42.525 56.475,42.5 56.475,40.967 v1(56.5,40.942)
  Bottom Layer w0.8: R57.1@56.45,42.525 56.475,42.5 56.475,40.967 v1(56.5,40.942)
NetD23_1: D23.1 R84.2 R92.2 TP16.1
NetD23_2: D23.2 R84.1 R98.2 R100.1 R102.1 RP9.2 TP22.1
NetD23_3: D23.3 R86.2 R88.1 R94.2 RP7.2 TP20.1
  other v2: 97.086,129.796
NetD23_5: D23.5 R85.2 R87.1 R93.2 RP6.2 TP19.1
NetD23_6: D23.6 R83.1 R97.2 R99.1 R101.1 RP8.2 TP21.1
  other v2: 83.286,144.821 78.322,144.851
NetD23_7: D23.7 R83.2 R91.2 TP15.1
  other v2: 84.371,131.389 86.831,141.041
NetD24_1: D24.1 R50.1 R52.2 TP40.1 | length 7.1
  Bottom Layer w0.5: TP40.1@66.883,100.466 R50.1@66.883,102.314 68.264,102.314 68.708,101.87 68.708,101.616 69.083,101.241 D24.1@69.458,101.241 R52.2@71.575,101.241
NetD24_2: D24.2 R50.2 X4.4 | length 12.7
  Bottom Layer w0.5: R50.2@66.883,103.918 68.264,103.918 68.708,104.362 68.708,104.616 69.083,104.991 D24.2@69.458,104.991 D24.2@69.733,105.266 ; D24.2@68.759,105.3 76.08,105.3 X4.4@77.38,104
NetD25_1: D25.1 R58.1 R60.2 TP45.1 | length 8.4
  Bottom Layer w0.5: D25.1@35.713,103.775 36.088,103.775 36.463,104.15 36.463,104.178 36.784,104.499 R60.2@38.288,104.499 ; R58.1@38.288,101.876 R60.2@38.288,104.499 ; TP45.1@41.2,104.55 41.175,104.525 38.314,104.525 R60.2@38.288,104.499
NetD25_2: D25.2 R60.1 X5.6 | length 14.2
  Bottom Layer w0.5: X5.6@25,106.54 28.939,106.54 29.924,107.525 D25.2@35.713,107.525 36.088,107.525 36.463,107.15 36.463,106.922 36.784,106.601 R60.1@38.288,106.601
NetD26_1: D26.1 R59.1 R61.2 TP46.1 | length 12.7
  Bottom Layer w0.5: D26.1@61.473,107.5 61.473,105.779 61.766,105.486 61.871,105.486 62.225,105.133 R61.2@62.225,104.982 ; R61.2@62.225,104.996 62.225,100.074 65.12,97.179 65.271,97.179 65.624,96.826 R59.1@65.624,96.675
NetD26_2: D26.2 R61.1 X4.6 | length 26.3
  Bottom Layer w0.5: 63.225,107.325 72.438,107.325 73.888,108.775 82.765,108.775 X4.6@85,106.54 ; R61.1@64.326,104.982 64.326,105.133 64.68,105.486 64.83,105.486 65.223,105.879 D26.2@65.223,107.5
NetD28_1: D28.1 R64.1 TP56.1
NetD29_1: D29.1 R113.1
NetD30_1: D30.1 R68.1
NetJ2_1: J2.1 R5.1 TP52.1 U14.6 Z1.1
NetJ2_3: J2.3 R65.2 U14.7 Z2.1
NetP1_2: P1.2 P7.2 U4.34
NetP1_3: P1.3 P7.3 U4.37
NetP2_2: P2.2 R20.2
NetP3_1: P3.1 U12.6
NetP3_2: P3.2 U12.7
NetP3_3: P3.3 U12.8
NetP3_4: P3.4 U12.5 U18.3
NetP3_5: P3.5 U18.4
NetP4_2: P4.2 R38.2
NetP5_3: P5.3 U4.2 X6.6
NetP5_4: P5.4 U4.3 X6.7
NetP5_5: P5.5 U4.41 X6.8
NetP6_3: P6.3 R3.1 TP55.1 U4.43 U13.6 X7.4
NetP6_4: P6.4 R4.1 TP51.1 U4.42 U13.4 X7.5
NetP6_5: P6.5 R64.2 R67.2 TP50.1 U4.27 U13.5 X7.6
  other v2: 224.332,227.704
NetP7_4: P7.4 U4.12 X6.10
NetP7_5: P7.5 U4.40 X6.9
NetP8_2: P8.2 R85.1
NetP9_2: P9.2 R86.1
NetP10_2: P10.2 R97.1
NetP11_2: P11.2 R98.1
NetP12_1: P12.1 U4.13
NetP12_2: P12.2 U4.20
NetP14_2: P14.2 R89.1 U4.45 U12.3 X6.5
NetP14_3: P14.3 R1.1 U4.46 U12.2 X6.4
NetR2_1: R2.1 U4.44
NetR8_1: R8.1 R63.1 TP54.1 U14.1
NetR9_1: R9.1 R62.1 TP49.1 U14.4
NetR10_1: R10.1 U4.7
NetR11_1: R11.1 U2.7 | length 15.3
  Top Layer w0.6: v1(26.24,13.516) 27.526,14.802 27.526,14.927 28.774,16.175 v1(37.304,16.175)
  Bottom Layer w0.6: v1(26.24,13.516) U2.7@26.24,15.536 ; R11.1@37.304,15.155 v1(37.304,16.175)
NetR12_1: R12.1 U5.7 | length 16.7
  Top Layer w0.6: v1(84.901,13.3) 93.473,13.3 v1(96.963,16.79)
  Bottom Layer w0.6: v1(84.901,13.3) U5.7@84.901,15.536 ; R12.1@96.963,15.8 v1(96.963,16.79)
NetR13_2: R13.2 TP5.1 U2.2 U4.29 | length 7.7
  Bottom Layer w0.6: TP5.1@22.794,26 24.82,23.975 25.993,23.975 R13.2@26.018,23.949 26.127,23.949 26.24,23.836 U2.2@26.24,20.464
NetR14_2: R14.2 R28.2 U2.3 U4.22 U6.3 | length 8.3
  Bottom Layer w0.6: U6.3@15.235,20.464 15.235,22.551 16.633,23.949 R28.2@16.784,23.949 ; U2.3@27.51,20.464 27.51,22.83 28.629,23.949 R14.2@28.78,23.949
NetR15_2: R15.2 TP6.1 U4.30 U5.2 | length 7.3
  Bottom Layer w0.6: TP6.1@81.225,25.439 81.485,25.439 83.162,23.761 84.168,23.761 R15.2@84.381,23.549 84.531,23.549 84.901,23.179 U5.2@84.901,20.464
NetR16_2: R16.2 R30.2 U4.21 U5.3 U7.3 | length 7.1
  Bottom Layer w0.6: U7.3@74.474,20.464 74.474,23.017 74.596,23.139 74.596,23.368 74.899,23.672 R30.2@75.05,23.672 ; U5.3@86.171,20.464 86.171,22.695 86.571,23.095 86.571,23.246 86.874,23.549 R16.2@87.025,23.549
NetR17_2: R17.2 U2.5 | length 2.6
  Bottom Layer w0.5: U2.5@28.78,15.536 28.78,15.646 28.809,15.675 R17.2@31.274,15.675
NetR18_2: R18.2 U5.5 | length 2.7
  Bottom Layer w0.5: U5.5@87.441,15.536 R18.2@90.03,15.536 R18.2@90.03,15.687
NetR20_1: R20.1 R22.1 U4.11
NetR25_1: R25.1 U6.7 | length 7
  Bottom Layer w0.6: R25.1@10.6,9.3 10.6,10.102 13.965,13.467 U6.7@13.965,14.901
NetR26_1: R26.1 U7.7 | length 11.2
  Bottom Layer w0.5: R26.1@68.875,6.125 68.875,8.492 73.204,12.821 U7.7@73.204,15.536
NetR27_2: R27.2 TP23.1 U4.32 U6.2 | length 7.7
  Bottom Layer w0.6: TP23.1@10.675,25.896 10.675,25.629 12.122,24.182 13.732,24.182 R27.2@13.965,23.949 U6.2@13.965,20.464
NetR29_2: R29.2 TP24.1 U4.33 U7.2 | length 7.5
  Bottom Layer w0.6: TP24.1@69.45,25.975 71.45,23.975 72.257,23.975 72.742,23.49 72.742,22.52 73.204,22.058 U7.2@73.204,20.464
NetR31_2: R31.2 U6.5 | length 9.6
  Bottom Layer w0.6: U6.5@16.505,14.851 16.505,13.577 19.796,10.286 R31.2@23.419,10.286
NetR32_2: R32.2 U7.5 | length 10.2
  Bottom Layer w0.5: U7.5@75.744,15.536 75.744,13.481 79.05,10.175 R32.2@82.524,10.175
NetR37_1: R37.1 U8.7 | length 2.5
  Bottom Layer w0.5: U8.7@27.695,96.425 R37.1@27.695,98.925
NetR38_1: R38.1 R39.1 U4.10
NetR40_1: R40.1 U9.7 | length 4.5
  Bottom Layer w0.5: U9.7@87.685,96.389 87.685,98.478 88.407,99.2 R40.1@89.806,99.2
NetR41_2: R41.2 TP33.1 U4.31 U8.2 | length 7.8
  Bottom Layer w0.5: U8.2@27.695,91.497 27.695,88.672 28.316,88.051 R41.2@28.467,88.051 28.493,88.025 29.575,88.025 TP33.1@31.6,86
NetR42_2: R42.2 R54.2 U4.25 U8.3 U10.3 | length 7.8
  Bottom Layer w0.5: R54.2@11.554,88.051 11.705,88.051 12.245,88.591 U10.3@12.245,91.622 ; R42.2@25.767,88.051 25.918,88.051 26.425,88.558 U8.3@26.425,91.497
NetR43_2: R43.2 TP34.1 U4.38 U9.2 | length 4.1
  Bottom Layer w0.5: U9.2@87.685,91.461 87.685,88.365 88.274,87.776 R43.2@88.425,87.776
NetR44_2: R44.2 R56.2 U4.26 U9.3 U11.3 | length 7.7
  Bottom Layer w0.5: R56.2@71.478,88.076 71.577,88.076 71.93,88.429 U11.3@71.93,91.536 ; R44.2@85.86,87.776 86.011,87.776 86.415,88.18 U9.3@86.415,91.461
NetR45_2: R45.2 U8.5 | length 4.2
  Bottom Layer w0.5: R45.2@22.405,94.389 22.413,94.397 24.2,94.397 25.126,95.323 25.126,96.396 U8.5@25.155,96.425
NetR46_2: R46.2 U9.5 | length 4
  Bottom Layer w0.5: R46.2@82.385,94.624 84.301,94.624 85.116,95.439 85.116,96.36 U9.5@85.145,96.389
NetR51_1: R51.1 U10.7 | length 4.1
  Bottom Layer w0.5: U10.7@13.515,96.55 13.515,99.504 13.629,99.699 13.774,99.948 13.424,99.819 R51.1@13.574,99.969
NetR52_1: R52.1 U11.7 | length 4.6
  Bottom Layer w0.5: U11.7@73.2,96.464 73.2,99.138 73.675,99.613 R52.1@73.675,100.891
NetR53_2: R53.2 TP41.1 U4.28 U10.2 | length 7.5
  Bottom Layer w0.5: U10.2@13.515,91.622 13.515,88.697 13.536,88.676 13.536,88.404 13.889,88.051 15.504,88.051 TP41.1@17.025,86.53
NetR55_2: R55.2 TP42.1 U4.39 U11.2 | length 8.1
  Bottom Layer w0.5: U11.2@73.2,91.536 73.2,88.76 73.58,88.38 R55.2@74.035,88.38 ; R55.2@74.035,88.076 74.06,88.05 75.514,88.05 TP42.1@77.54,86.025
NetR58_2: R58.2 U10.5 | length 31.8
  Top Layer w0.5: v1(10.975,98.3) 13.234,100.559 28.766,100.559 31.28,98.045 34.308,98.045 v4(36.088,99.825)
  Bottom Layer w0.5: U10.5@10.975,96.55 v1(10.975,98.3) ; v4(36.088,99.825) 36.114,99.8 38.263,99.8 R58.2@38.288,99.774
NetR59_2: R59.2 U11.5 | length 3
  Bottom Layer w0.5: R59.2@67.726,96.675 67.937,96.464 U11.5@70.66,96.464
NetR62_2: R62.2 U13.13
NetR63_2: R63.2 U13.11
NetR66_2: R66.2 TP53.1 U13.12 U14.2 U14.3
NetR91_1: R91.1 R95.2 TP17.1 U4.19
NetR92_1: R92.1 R96.2 TP18.1 U4.18
NetR113_2: R113.2 U4.4 X7.10
NetU4_14: U4.14 X3.7
NetU4_15: U4.15 X2.7
NetU4_16: U4.16 X5.7
NetU4_17: U4.17 X4.7
VCC: C3.2 C4.2 C7.1 C9.1 C14.2 C15.2 C16.2 C20.2 C25.2 C29.2 D1.2 D2.2 D7.2 D8.2 D13.2 D14.2 D19.2 D20.2 J1.2 J15.2 RG1.1 U2.1 U5.1 U6.1 U7.1 U8.1 U9.1 U10.1 U11.1 | length 43
  Bottom Layer w0.6: D7.2@7.025,19.85 7.025,19.914 7.575,20.464 9.968,20.464 U6.1@12.695,20.464 ; U10.1@14.785,91.622 14.785,92.229 14.806,92.25 17.025,92.25 D19.2@19.196,92.25 ; D1.2@19.775,20.305 19.934,20.464 22.55,20.464 U2.1@24.97,20.464 ; U8.1@28.965,91.497 28.965,91.704 28.986,91.725 D13.2@34.025,91.725 ; D8.2@67,20.175 67.289,20.464 U7.1@71.934,20.464 ; U11.1@74.47,91.536 74.47,90.922 74.491,90.901 76.162,90.901 76.292,90.771 C29.2@76.738,90.771 ; C29.2@76.838,90.916 78.745,90.916 79.45,91.621 D20.2@79.45,92.021 ; D2.2@78.852,20.305 79.011,20.464 81.186,20.464 81.225,20.425 C4.2@81.55,20.425 ; C4.2@81.55,20.464 U5.1@83.631,20.464 ; U9.1@88.955,91.461 88.955,91.656 88.976,91.677 91.129,91.677 91.131,91.675 92.13,91.675 92.133,91.677 93.752,91.677 D14.2@94,91.925
pads on no net: U13.3 U13.14 X7.7 X7.8 X7.9
copper on no net:
  other v1: 16.505,22.084 28.78,22.084 75.744,22.084 87.441,22.084 82.78,22.446 71.083,22.52 11.844,22.551 22.55,23.836
  other v2: 86.336,158.109
  other v3: 5,5 95,5 5,105 95,105

## Silkscreen, mask and mechanical layers (free items; w line width, h text height)
Mechanical 1:
  lines w0.2: 0,4.459 0,105 cw(c5,105) 5,110 95,110 cw(c95,105) 100,105 100,5 cw(c95,5) 95,0 5,0 cw(c5,5) 0,5

## Text inside footprints (layer, text, board x,y; h text height)
C2: Top Overlay "-" at 65.965,37.81 h0.8 r270; Top Overlay "+" at 65.343,30.19 h0.8 r270
C45: Top Overlay "-" at 53.685,13.26 h0.8 r180; Top Overlay "+" at 46.065,13.882 h0.8 r180
P14: Top Overlay "5" at 253.125,162.47 h1.02 r270; Top Overlay "1" at 253.125,160.87 h1.02 r270
U2: Bottom Overlay "*" at 24.539,21.035 h1.27 r90; Mechanical 13 "*" at 25.719,19.93 h1.27 r90
U5: Bottom Overlay "*" at 83.2,21.035 h1.27 r90; Mechanical 13 "*" at 84.381,19.93 h1.27 r90
U6: Bottom Overlay "*" at 12.264,21.035 h1.27 r90; Mechanical 13 "*" at 13.444,19.93 h1.27 r90
U7: Bottom Overlay "*" at 71.503,21.035 h1.27 r90; Mechanical 13 "*" at 72.683,19.93 h1.27 r90
U8: Bottom Overlay "*" at 29.396,90.926 h1.27 r270; Mechanical 13 "*" at 28.216,92.031 h1.27 r270
U9: Bottom Overlay "*" at 89.386,90.89 h1.27 r270; Mechanical 13 "*" at 88.206,91.995 h1.27 r270
U10: Bottom Overlay "*" at 15.216,91.051 h1.27 r270; Mechanical 13 "*" at 14.036,92.156 h1.27 r270
U11: Bottom Overlay "*" at 74.901,90.965 h1.27 r270; Mechanical 13 "*" at 73.721,92.07 h1.27 r270